# Altium PCB PCB2.PcbDoc (part 2 of 2)
Units mm, origin at the board's own origin, x right, y up, seen from the top; angles counter-clockwise.
Board outline 120.9 x 134.75 mm, 2 copper layers (Top Layer, Bottom Layer); 83 components, 152 nets, 445 pads, 108 vias.
Unrouted connection lines stored in the file: 2.
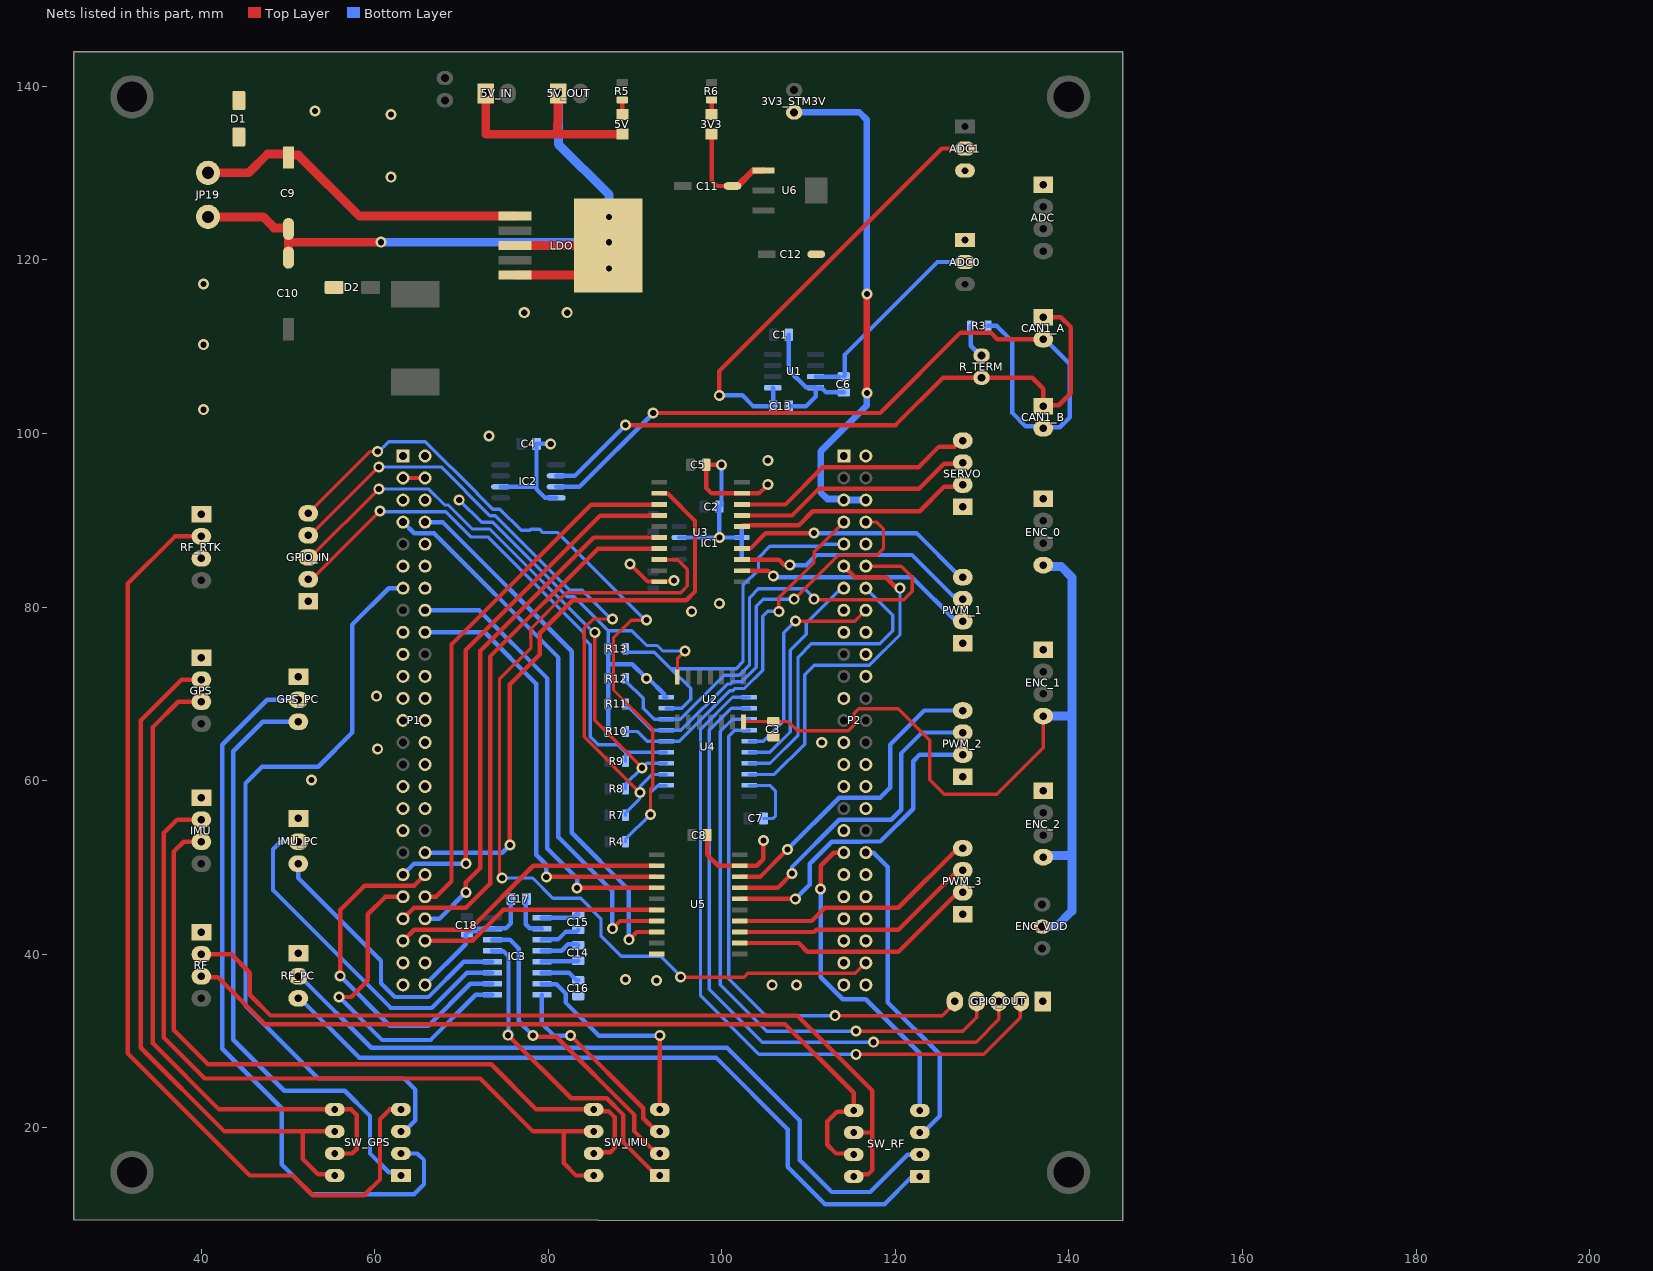
[diagram p2: the nets of this part, all layers, seen from the top]

## Via types
v1: diameter 1.27, hole 0.711, Top Layer to Bottom Layer, 108 vias

## Nets (pads, with @x,y where several pads share a name; then routed paths per layer and width w, separated by ;. In a path a pad name is that pad's centre, name@x,y a point inside that pad or via, vN(x,y) a via of type N, cw(c..) or ccw(c..) an arc to the next point about the centre after c; other vN are vias at no path point) (continued)
GND: 3V3.2 5V.2 5V_IN.1 5V_OUT.1 ADC0.1 ADC1.3 ADC.1 C1.1 C2.1 C3.1 C4.1 C5.1 C6.2 C7.1 C8.1 C9.2 C10.2 C11.2 C12.2 C13.2 C16.1 C17.1 C18.1 D1.A D2.A ENC_0.1 ENC_1.1 ENC_2.1 GPIO_IN.1 GPIO_OUT.1 GPS.1 GPS_PC.1 IC1.1 IC1.2 IC1.3 IC1.4 IC1.7 IC2.2 IC2.8 IC3.15 IMU.1 IMU_PC.1 JP19.1 LDO.3 LDO.5 LDO.6 P1.1 P1.2 P1.5 P1.23 P1.49 P1.50 P2.1 P2.2 P2.49 P2.50 PWM_1.1 PWM_2.1 PWM_3.1 R10.1 R11.1 R12.1 R13.1 RF.1 RF_PC.1 RF_RTK.1 SERVO.1 U1.4 U2.7 U3.10 U3.19 U4.10 U4.19 U5.10 U5.19 U6.1 | length 289.9
  Top Layer w0.381: U2.7@94.869,71.933 94.869,74.041 v1(95.758,74.93)
  Top Layer w0.508: v1(89.408,84.963) 91.427,82.944 92.748,82.944 U3.10@92.761,82.931 92.773,82.944 94.374,82.944 v1(94.488,83.058) ; C8.1@98.309,53.721 98.309,51.424 99.568,50.165 U5.19@102.057,50.165 104.007,50.165 104.775,50.933 v1(104.775,53.086) ; 3V3.2@98.806,134.493 98.806,129.159 99.441,128.524 C11.2@101.219,128.524 ; v1(99.949,96.393) C5.1@98.182,96.393 98.182,93.715 98.806,93.091 U3.19@102.311,93.091 104.267,93.091 v1(105.283,94.107)
  Top Layer w0.762: C11.2@101.219,128.524 101.79,128.524 103.552,130.285 104.744,130.285 U6.1@104.775,130.316
  Top Layer w1.016: JP19.1@40.767,124.968 47.117,124.968 48.387,123.698 49.657,123.698 C9.2@50.038,123.317 ; C10.2@50.038,120.269 50.038,122.047 ; C9.2@50.038,123.571 C9.2@50.038,123.317 ; v1(60.706,122.047) 50.038,122.047 ; 5V_IN.1@72.771,139.192 72.771,134.493 80.801,134.493 81.032,134.725 ; LDO.5@76.15,118.266 83.5,118.266 LDO.6@86.9,121.666 LDO.3@76.15,121.666 ; 5V_OUT.1@81.153,139.065 81.032,134.725 ; 5V.2@88.392,134.493 81.026,134.493 81.032,134.725 ; 50.038,122.047 C9.2@50.038,123.317
  Bottom Layer w0.381: v1(69.723,92.329) 72.299,89.753 73.579,89.753 82.153,81.179 82.961,81.179 86.884,77.255 ; R13.1@86.884,75.184 86.884,77.255 ; v1(95.758,74.93) 93.153,74.93 92.518,75.565 91.323,75.565 89.633,77.255 86.884,77.255 ; U4.19@103.149,59.436 105.537,59.436 106.172,58.801 106.172,55.88 105.918,55.626 C7.1@104.786,55.626
  Bottom Layer w0.508: P1.50@65.786,36.449 70.482,41.145 70.482,42.277 C18.1@70.612,42.407 70.858,42.653 71.609,42.653 71.882,42.926 IC3.15@73.54,42.926 73.868,42.926 73.914,42.972 75.103,42.972 75.681,43.55 C17.1@75.681,46.355 ; IC2.2@74.48,93.853 78.624,93.853 ; v1(80.264,98.806) C4.1@78.624,98.806 78.624,93.853 ; IC2.8@80.899,92.583 80.881,92.601 79.611,92.601 78.624,93.588 78.624,93.853 ; R10.1@86.884,65.659 R11.1@86.884,68.834 R12.1@86.884,71.755 86.884,73.406 ; R13.1@86.884,75.184 86.884,73.406 ; U4.10@93.599,69.596 93.345,69.596 93.345,69.94 91.53,71.755 v1(91.324,71.755) 89.673,73.406 86.884,73.406 ; IC1.7@95.079,88.011 95.084,88.016 v1@99.7,88.016 ; v1(99.949,96.393) 99.949,91.81 C2.1@99.706,91.567 v1(99.706,88.022) v1@99.7,88.016 ; IC1.4@102.279,85.471 IC1.3@102.279,86.741 IC1.2@102.279,88.011 ; IC1.1@102.279,89.281 IC1.2@102.279,88.011 ; C13.2@107.707,103.124 109.667,103.124 110.801,104.258 U1.4@110.801,105.283 ; C1.1@107.707,111.379 107.707,107.304 109.682,105.329 110.755,105.329 U1.4@110.801,105.283 ; C6.2@114.046,104.764 112.005,104.764 111.486,105.283 U1.4@110.801,105.283 ; v1@99.7,88.016 99.695,88.011 IC1.2@102.279,88.011
  Bottom Layer w1.016: v1(60.706,122.047) v1(86.995,122.047) 86.995,127.508 81.153,133.35 5V_OUT.1@81.153,139.192
  other v1: 105.791,36.449 108.585,36.449 92.456,36.957 88.9,37.084 52.705,60.071 60.325,63.627 111.506,64.389 60.198,69.723 96.52,79.502 99.695,80.391 105.283,96.901 73.152,99.695 40.259,102.743 40.259,110.236 77.216,113.919 82.169,113.919 40.259,117.221 86.995,118.999 86.995,124.968 61.849,129.54 61.849,136.779 53.086,137.16
GPS_RX: GPS.3 SW_GPS.5 SW_GPS.7 | length 76.8
  Top Layer w0.508: GPS.3@40.005,69.088 37.338,69.088 34.417,66.167 34.417,29.718 42.037,22.098 56.642,22.098 57.277,22.098 57.912,21.463 57.912,17.526 57.404,17.018 SW_GPS.7@55.372,17.018
GPS_RX_MCU: P1.13 SW_GPS.3 | length 89.7
  Bottom Layer w0.508: SW_GPS.3@62.992,19.558 63.373,19.558 64.643,20.828 64.643,24.384 63.373,25.654 53.467,25.654 45.085,34.036 45.085,59.69 46.99,61.595 53.467,61.595 57.404,65.532 57.404,77.978 61.595,82.169 P1.13@63.246,82.169
GPS_RX_PC: GPS_PC.3 SW_GPS.1 | length 70.3
  Bottom Layer w0.508: 43.688,31.369 43.688,30.125 49.556,24.257 56.515,24.257 59.436,21.336 59.436,17.018 61.613,14.841 SW_GPS.1@62.992,14.841 ; 43.688,31.395 43.688,63.373 47.079,66.764 GPS_PC.3@51.181,66.764
GPS_TX: GPS.2 SW_GPS.6 SW_GPS.8 | length 80.6
  Top Layer w0.508: GPS.2@40.005,71.628 37.719,71.628 33.02,66.929 33.02,29.21 42.672,19.558 51.689,19.558 ; SW_GPS.8@55.372,14.478 55.245,14.605 53.467,14.605 51.689,16.383 51.689,19.558 ; SW_GPS.6@55.372,19.558 51.689,19.558
GPS_TX_MCU: P1.14
GPS_TX_PC: GPS_PC.2 SW_GPS.2 | length 86.8
  Bottom Layer w0.508: GPS_PC.2@51.181,69.304 47.587,69.304 42.418,64.135 42.418,30.988 42.418,30.861 42.418,29.083 49.276,22.225 49.276,15.748 52.705,12.319 64.516,12.319 65.659,13.462 65.659,16.256 64.897,17.018 SW_GPS.2@62.992,17.018 SW_GPS.2@62.357,17.018
IMU_RX: IMU.3 SW_IMU.5 SW_IMU.7 | length 85.4
  Top Layer w0.508: IMU.3@40.005,52.959 37.973,52.959 36.83,51.816 36.83,31.242 40.767,27.305 73.406,27.305 78.613,22.098 SW_IMU.5@85.217,22.098 85.411,21.904 86.935,21.904 87.63,21.209 87.63,17.653 87.122,17.145 85.344,17.145 SW_IMU.7@85.217,17.018
IMU_RX_MCU: IC3.9 P1.41 | length 38.5
  Top Layer w0.508: v1(55.88,35.052) 57.277,35.052 59.182,36.957 59.182,44.577 61.214,46.609 P1.41@63.246,46.609
  Bottom Layer w0.508: v1(55.88,35.052) 60.833,30.099 66.421,30.099 71.628,35.306 IC3.9@73.54,35.306
IMU_RX_MCU_232: IC3.8 SW_IMU.3 | length 22.7
  Top Layer w0.508: v1(82.55,30.607) 90.932,22.225 90.932,21.082 92.456,19.558 SW_IMU.3@92.837,19.558
  Bottom Layer w0.508: IC3.8@79.248,35.306 79.248,32.004 80.645,30.607 v1(82.55,30.607)
IMU_RX_PC: IC3.12 IMU_PC.3 | length 32.9
  Bottom Layer w0.508: IMU_PC.3@51.181,50.419 51.181,48.768 60.706,39.243 60.706,36.632 62.286,35.052 66.168,35.052 70.232,39.116 IC3.12@73.54,39.116
IMU_RX_PC_232: IC3.13 SW_IMU.1 | length 37.3
  Top Layer w0.508: v1(75.357,30.653) 82.641,23.368 86.728,23.368 88.646,21.45 88.646,18.288 92.456,14.478 SW_IMU.1@92.837,14.478
  Bottom Layer w0.508: IC3.13@73.54,40.386 73.586,40.34 74.794,40.34 75.402,39.732 75.402,30.698 v1(75.357,30.653)
IMU_TX: IMU.2 SW_IMU.6 SW_IMU.8 | length 90.3
  Top Layer w0.508: IMU.2@40.005,55.499 37.211,55.499 35.687,53.975 35.687,30.353 40.386,25.654 72.136,25.654 78.232,19.558 81.788,19.558 ; SW_IMU.8@85.217,14.478 83.185,14.478 81.788,15.875 81.788,19.558 ; SW_IMU.6@85.217,19.558 81.788,19.558
IMU_TX_MCU: IC3.10 P1.40 | length 41
  Top Layer w0.508: v1(56.007,37.465) 56.007,45.085 58.801,47.879 64.516,47.879 P1.40@65.786,49.149
  Bottom Layer w0.508: v1(56.007,37.465) 61.722,31.75 66.167,31.75 70.993,36.576 IC3.10@73.54,36.576
IMU_TX_MCU_232: IC3.7 SW_IMU.4 | length 25.2
  Top Layer w0.508: SW_IMU.4@92.837,22.098 v1(92.837,30.607)
  Bottom Layer w0.508: IC3.7@79.248,36.576 79.294,36.53 80.945,36.53 81.977,35.498 81.977,34.426 85.796,30.607 v1(92.837,30.607)
IMU_TX_PC: IC3.11 IMU_PC.2 | length 40.6
  Bottom Layer w0.508: IMU_PC.2@51.181,52.959 49.149,52.959 48.26,52.07 48.26,47.371 61.849,33.782 66.548,33.782 70.612,37.846 IC3.11@73.54,37.846
IMU_TX_PC_232: IC3.14 SW_IMU.2 | length 35.5
  Top Layer w0.508: v1(78.232,30.607) 78.372,30.467 80.894,30.467 89.916,21.445 89.916,19.558 92.456,17.018 SW_IMU.2@92.837,17.018
  Bottom Layer w0.508: IC3.14@73.54,41.656 75.565,41.656 76.581,40.64 76.581,32.258 v1(78.232,30.607)
IN0: GPIO_IN.5 R4.1 U4.2 | length 87.3
  Top Layer w0.381: GPIO_IN.5@52.324,90.805 59.436,97.917 v1(60.325,97.917) ; v1(91.313,78.486) 89.535,78.486 87.503,76.454 87.503,70.435 92.011,65.926 92.011,59.272 91.757,59.018 v1(91.757,56.082)
  Bottom Layer w0.381: v1(60.325,97.917) 60.495,97.747 60.495,97.96 61.595,99.06 65.824,99.06 71.793,93.092 71.793,93.058 73.574,91.277 74.403,91.277 76.843,88.837 77.851,88.837 77.978,88.963 78.986,88.963 79.367,88.582 81.09,88.582 91.186,78.486 v1(91.313,78.486) ; R4.1@88.884,52.959 88.884,53.209 v1(91.757,56.082) 91.757,58.571 92.61,59.423 93.586,59.423 U4.2@93.599,59.436
IN1: GPIO_IN.4 R7.1 U4.3 | length 78.5
  Top Layer w0.381: GPIO_IN.4@52.324,88.265 52.546,88.265 60.42,96.139 v1(60.452,96.139) ; v1(87.376,78.613) 85.162,78.613 84.138,77.589 84.138,65.03 v1(90.551,58.616)
  Bottom Layer w0.381: v1(60.452,96.139) 67.634,96.139 73.258,90.515 73.895,90.515 82.469,81.941 83.479,81.941 83.921,81.941 87.249,78.613 v1(87.376,78.613) ; R7.1@88.884,56.007 88.884,56.257 90.551,57.924 v1(90.551,58.616) 90.551,59.309 91.935,60.693 93.586,60.693 U4.3@93.599,60.706
IN2: GPIO_IN.3 R8.1 U4.4 | length 67.2
  Top Layer w0.381: GPIO_IN.3@52.324,85.725 52.546,85.725 60.42,93.599 v1(60.452,93.599) ; v1(85.344,77.089) 85.344,66.929 v1(90.805,61.468)
  Bottom Layer w0.381: v1(60.452,93.599) 66.205,93.599 68.047,91.757 68.461,91.757 71.228,88.991 73.263,88.991 85.165,77.089 v1(85.344,77.089) ; R8.1@88.884,59.055 88.884,59.547 v1(90.805,61.468) 91.313,61.976 U4.4@93.599,61.976
IN3: GPIO_IN.2 R9.1 U4.5 | length 63.7
  Top Layer w0.381: GPIO_IN.2@52.324,83.185 52.705,83.185 v1(60.579,91.059)
  Bottom Layer w0.381: v1(60.579,91.059) 60.642,90.995 67.731,90.995 68.146,90.995 71.067,88.075 73.017,88.075 84.138,76.954 84.138,76.339 84.836,75.64 84.836,65.024 85.725,64.135 87.995,64.135 88.884,63.246 ; R9.1@88.884,62.23 88.884,63.246 ; U4.5@93.599,63.246 88.884,63.246
IN_0: P2.11 U4.18 | length 41.6
  Top Layer w0.508: P2.11@114.046,84.709 115.328,83.427 118.884,83.427 120.142,82.169 v1(120.523,82.169)
  Bottom Layer w0.381: U4.18@103.149,60.706 106.045,60.706 109.537,64.198 109.537,72.2 110.617,73.279 117.005,73.279 120.523,76.797 v1(120.523,82.169)
IN_1: P2.14 U4.17 | length 34.3
  Bottom Layer w0.381: U4.17@103.149,61.976 103.152,61.979 105.54,61.979 108.775,65.215 108.775,74.231 110.299,75.755 118.173,75.755 119.697,77.279 119.697,79.057 P2.14@116.586,82.169
IN_2: P2.13 U4.16 | length 25
  Bottom Layer w0.381: U4.16@103.149,63.246 105.537,63.246 107.886,65.596 107.886,74.993 109.728,76.835 109.728,78.119 113.778,82.169 P2.13@114.046,82.169
IN_3: P2.16 U4.15 | length 25.6
  Top Layer w0.381: v1(108.47,78.371) 115.328,78.371 P2.16@116.586,79.629
  Bottom Layer w0.381: U4.15@103.149,64.516 104.775,64.516 107.124,66.865 107.124,77.025 v1(108.47,78.371)
NC: P1.48
Net3V3_1: 3V3.1 R6.2 | length 1.7
  Top Layer w0.508: 3V3.1@98.806,136.779 R6.2@98.806,138.446
Net5V_1: 5V.1 R5.2 | length 1.7
  Top Layer w0.508: 5V.1@88.519,136.779 R5.2@88.519,138.446
NET_H: CAN1_A.2 CAN1_B.2 IC2.7 R3.1 | length 93.9
  Top Layer w0.508: v1(92.075,102.362) 118.237,102.362 127.508,111.633 130.97,111.633 131.732,110.871 CAN1_A.2@137.033,110.871
  Bottom Layer w0.508: IC2.7@80.899,93.853 83.584,93.853 92.075,102.344 v1(92.075,102.362) ; R3.1@130.667,112.395 131.687,112.395 133.477,110.605 133.477,102.362 135.001,100.838 136.779,100.838 CAN1_B.2@137.033,100.584 137.16,100.711 138.938,100.711 140.081,101.854 140.081,108.013 137.224,110.871 CAN1_A.2@137.033,110.871
NET_L: CAN1_A.1 CAN1_B.1 IC2.6 R_TERM.2 | length 78.4
  Top Layer w0.508: v1(88.9,100.965) 120.015,100.965 125.476,106.426 R_TERM.2@129.921,106.426 135.763,106.426 137.033,105.156 CAN1_B.1@137.033,103.124 137.16,103.251 138.811,103.251 140.208,104.648 140.208,112.268 139.065,113.411 CAN1_A.1@137.033,113.411
  Bottom Layer w0.508: IC2.6@80.899,95.123 83.058,95.123 v1(88.9,100.965)
NetADC0_2: ADC0.2 C6.1 U1.3 | length 23.6
  Bottom Layer w0.508: U1.3@110.801,106.553 C6.1@113.538,106.553 ; C6.1@114.046,106.564 114.173,106.691 114.173,109.093 124.841,119.761 ADC0.2@128.016,119.761
NetADC1_2: ADC1.2 C13.1 U1.5 | length 50.7
  Top Layer w0.508: v1(99.695,104.394) 99.695,107.196 125.341,132.842 ADC1.2@128.016,132.842
  Bottom Layer w0.508: v1(99.695,104.394) 102.362,104.394 103.632,103.124 C13.1@105.907,103.124 105.907,105.237 U1.5@105.861,105.283
NetC14_1: C14.1 IC3.5 | length 4.2
  Bottom Layer w0.508: IC3.5@79.248,39.116 79.294,39.162 83.369,39.162 C14.1@83.439,39.232
NetC14_2: C14.2 IC3.4 | length 4.6
  Bottom Layer w0.508: IC3.4@79.248,40.386 81.534,40.386 82.296,41.148 83.323,41.148 C14.2@83.439,41.032
NetC15_1: C15.1 IC3.3 | length 4.7
  Bottom Layer w0.508: IC3.3@79.248,41.656 79.28,41.688 81.11,41.688 81.977,42.555 83.206,42.555 C15.1@83.439,42.788
NetC15_2: C15.2 IC3.1 | length 4.4
  Bottom Layer w0.508: IC3.1@79.248,44.196 82.847,44.196 83.239,44.588 C15.2@83.439,44.588
NetC16_2: C16.2 IC3.6 | length 4.6
  Bottom Layer w0.508: IC3.6@79.248,37.846 82.361,37.846 83.239,36.968 C16.2@83.439,36.968
NetC17_2: C17.2 IC3.2 | length 5
  Bottom Layer w0.508: C17.2@77.481,46.355 77.386,46.26 77.386,43.432 77.846,42.972 79.202,42.972 IC3.2@79.248,42.926
NetR3_2: R3.2 R_TERM.1 | length 4
  Bottom Layer w0.508: R3.2@128.667,112.395 128.667,110.118 129.794,108.991 R_TERM.1@129.921,108.991
NRST: P1.6
OUT0: GPIO_OUT.5 U4.14 | length 59.2
  Top Layer w0.381: v1(113.03,32.893) 125.38,32.893 126.84,34.353 GPIO_OUT.5@126.84,34.544
  Bottom Layer w0.381: U4.14@103.149,65.786 101.473,65.786 100.774,65.087 100.774,37.148 105.029,32.893 v1(113.03,32.893)
OUT1: GPIO_OUT.4 U4.13 | length 67.4
  Top Layer w0.381: v1(115.443,31.115) 127.762,31.115 129.38,32.733 GPIO_OUT.4@129.38,34.544
  Bottom Layer w0.381: U4.13@103.149,67.056 101.219,67.056 99.822,65.659 99.822,36.449 105.156,31.115 v1(115.443,31.115)
OUT2: GPIO_OUT.3 U4.12 | length 74.5
  Top Layer w0.381: v1(117.475,29.845) 129.286,29.845 131.922,32.481 131.922,32.797 131.92,32.799 GPIO_OUT.3@131.92,34.544
  Bottom Layer w0.381: U4.12@103.149,68.326 101.092,68.326 98.552,65.786 98.552,35.941 104.648,29.845 v1(117.475,29.845)
OUT3: GPIO_OUT.2 U4.11 | length 81.2
  Top Layer w0.381: v1(115.443,28.448) 130.175,28.448 134.366,32.639 134.366,34.45 GPIO_OUT.2@134.46,34.544
  Bottom Layer w0.381: U4.11@103.149,69.596 101.219,69.596 97.536,65.913 97.536,35.179 104.267,28.448 v1(115.443,28.448)
OUT_0: P2.7 R10.2 U4.6 | length 41.4
  Top Layer w0.381: v1(106.553,79.502) 106.553,81.067 110.617,85.131 110.617,86.36 P2.7@114.046,89.789
  Bottom Layer w0.381: R10.2@88.884,65.659 90.228,65.659 91.371,64.516 U4.6@93.599,64.516 93.61,64.527 95.072,64.527 100.903,70.358 101.271,70.358 101.525,70.612 102.602,70.612 104.712,72.721 104.712,78.93 105.283,79.502 v1(106.553,79.502)
OUT_1: P2.8 R11.2 U4.7 | length 48.4
  Top Layer w0.381: v1(108.331,80.899) 113.399,85.967 117.844,85.967 118.618,86.741 118.618,89.027 117.856,89.789 P2.8@116.586,89.789
  Bottom Layer w0.381: R11.2@88.884,68.834 91.932,65.786 U4.7@93.599,65.786 95.254,65.786 100.588,71.12 100.955,71.12 101.209,71.374 102.287,71.374 103.95,73.037 103.95,80.073 104.775,80.899 v1(108.331,80.899)
OUT_2: P2.12 R12.2 U4.8 | length 55.1
  Top Layer w0.381: v1(110.617,80.899) 110.68,80.835 120.959,80.835 121.92,81.796 121.92,83.439 120.65,84.709 P2.12@116.586,84.709
  Bottom Layer w0.381: R12.2@88.884,71.755 88.884,71.505 90.932,69.457 90.932,68.326 92.202,67.056 U4.8@93.599,67.056 95.185,67.056 100.265,72.136 101.971,72.136 103.188,73.353 103.188,81.09 104.203,82.105 109.537,82.105 110.617,81.026 v1(110.617,80.899)
OUT_3: P2.9 R13.2 U4.9 | length 45.9
  Bottom Layer w0.381: R13.2@88.884,75.184 88.884,75.013 89.094,74.803 92.202,74.803 94.107,72.898 ; U4.9@93.599,68.326 95.377,68.326 96.393,69.342 96.393,70.612 94.107,72.898 ; P2.9@114.046,87.249 111.578,87.249 111.324,86.995 105.537,86.995 104.219,85.677 104.219,84.28 102.425,82.486 102.425,73.668 101.655,72.898 94.107,72.898
PA0: P1.12
PA1: P1.11
PA4: P1.16 U5.4 | length 52.1
  Top Layer w0.508: v1(83.312,47.625) U5.4@92.507,47.625
  Bottom Layer w0.508: P1.16@65.786,79.629 72.009,79.629 79.883,71.755 79.883,52.141 83.312,48.712 v1(83.312,47.625)
PA6: P1.18 U5.3 | length 50.8
  Top Layer w0.508: v1(79.756,48.895) U5.3@92.507,48.895
  Bottom Layer w0.508: P1.18@65.786,77.089 72.662,77.089 78.613,71.138 78.613,51.435 79.756,50.292 v1(79.756,48.895)
PA7: P1.17
PA8: P2.43
PA9: P2.44
PA10: P2.41
PA13: P2.42
PA14: P2.39
PA15: P2.40
PB0: P1.22
PB1: P1.21
PB2: P1.24
PB6: P2.23
PB9: P2.20
PB10: P1.34
PB11: P1.35
PB14: P1.38 U3.2 | length 69.4
  Top Layer w0.508: v1(75.565,52.578) 75.565,71.102 78.994,74.531 78.994,76.962 82.804,80.772 95.885,80.772 96.901,81.788 96.901,89.927 93.75,93.078 92.773,93.078 U3.2@92.761,93.091
  Bottom Layer w0.508: P1.38@65.786,51.689 74.676,51.689 v1(75.565,52.578)
PB15: P1.39 U3.4 | length 61.1
  Top Layer w0.508: v1(70.485,50.419) 70.485,75.057 85.966,90.538 92.748,90.538 U3.4@92.761,90.551
  Bottom Layer w0.508: P1.39@63.246,49.149 64.516,50.419 v1(70.485,50.419)
PC0: P1.8 U5.8 | length 62.6
  Top Layer w0.508: v1(89.281,41.656) 90.17,42.545 U5.8@92.507,42.545
  Bottom Layer w0.508: P1.8@65.786,89.789 67.8,89.789 82.677,74.912 82.677,53.975 89.281,47.371 v1(89.281,41.656)
PC1: P1.7 U5.7 | length 63.7
  Top Layer w0.508: v1(87.376,42.926) 88.265,43.815 U5.7@92.507,43.815
  Bottom Layer w0.508: P1.7@63.246,89.789 64.528,88.507 66.814,88.507 81.153,74.168 81.153,53.467 87.376,47.244 v1(87.376,42.926)
PC2: P1.10
PC5: P1.19
PC6: P2.47
PC7: P2.48 U3.8 | length 104.7
  Top Layer w0.381: v1(74.676,48.768) 74.358,49.085 74.358,71.691 77.995,75.328 77.966,77.466 82.049,81.661 95.25,81.661 96.012,82.423 96.012,84.328 94.882,85.458 92.773,85.458 U3.8@92.761,85.471 ; v1(95.25,37.338) 102.546,37.338 103.002,37.794 115.391,37.794 P2.48@116.586,38.989
  Bottom Layer w0.381: v1(74.676,48.768) 78.177,48.768 80.526,46.419 83.723,46.419 86.058,44.084 86.058,42.085 88.392,39.751 92.964,39.751 95.25,37.465 v1(95.25,37.338)
PC8: P2.45
PC9: P2.46
PC10: P2.37 SW_RF.4 | length 37.8
  Top Layer w0.508: v1(111.379,47.498) 111.379,50.165 112.903,51.689 P2.37@114.046,51.689
  Bottom Layer w0.508: v1(111.379,47.498) 111.379,37.337 113.918,34.798 116.586,34.798 122.809,28.575 SW_RF.4@122.809,21.971
PC11: P2.38 SW_RF.3 | length 37.5
  Bottom Layer w0.508: P2.38@116.586,51.689 117.475,51.689 119.126,50.038 119.126,34.417 125.095,28.448 125.095,21.336 123.19,19.431 SW_RF.3@122.809,19.431
PC12: P2.35
PC15: P2.10
PD2: P2.34
PD3: P2.31
PD4: P2.32
PD5: P2.29
PD6: P2.30
PD7: P2.27
PD10: P1.42 U3.3 | length 61.7
  Top Layer w0.508: P1.42@65.786,46.609 67.056,46.609 68.834,48.387 68.834,75.692 84.95,91.808 92.748,91.808 U3.3@92.761,91.821
PD11: P1.43 U3.7 | length 62.5
  Top Layer w0.508: P1.43@63.246,44.069 64.504,45.327 70.491,45.327 73.279,48.115 73.279,74.295 85.712,86.728 92.748,86.728 U3.7@92.761,86.741
PD12: P1.44 U3.6 | length 60.5
  Top Layer w0.508: v1(70.485,47.117) 70.485,48.26 72.136,49.911 72.136,74.93 85.217,88.011 U3.6@92.761,88.011
  Bottom Layer w0.508: P1.44@65.786,44.069 67.437,44.069 v1(70.485,47.117)
PD13: P1.45 U5.2 | length 32.8
  Top Layer w0.508: P1.45@63.246,41.529 64.528,42.811 70.896,42.811 78.25,50.165 U5.2@92.507,50.165
PD14: P1.46 U5.6 | length 28.2
  Top Layer w0.508: P1.46@65.786,41.529 71.247,41.529 74.803,45.085 U5.6@92.507,45.085
PD15: P1.47
PE0: P2.17
PE1: P2.18
PE2: P2.15
PE7: P1.25
PE8: P1.26
PE10: P1.28
PE12: P1.30
PE13: P1.31
PE14: P1.32
PE15: P1.33
PWM0: SERVO.4 U3.18 | length 28.2
  Top Layer w0.508: U3.18@102.311,91.821 107.315,91.821 111.621,96.127 122.67,96.127 125.031,98.489 126.809,98.489 SERVO.4@127.508,99.187
PWM0_DIR+: SERVO.2 U3.16 | length 27.2
  Top Layer w0.508: U3.16@102.311,89.281 102.438,89.408 108.839,89.408 110.478,91.047 122.797,91.047 125.603,93.853 127.254,93.853 SERVO.2@127.508,94.107
PWM0_DIR-: SERVO.3 U3.17 | length 27.7
  Top Layer w0.508: U3.17@102.311,90.551 108.077,90.551 111.137,93.611 122.694,93.611 125.603,96.52 127.381,96.52 SERVO.3@127.508,96.647
PWM1: PWM_1.4 U3.14 | length 28
  Top Layer w0.508: U3.14@102.311,86.741 103.287,86.741 105.065,88.519 v1(110.617,88.519)
  Bottom Layer w0.508: v1(110.617,88.519) 122.428,88.519 PWM_1.4@127.508,83.439
PWM1_DIR+: PWM_1.2 U3.12 | length 27.6
  Top Layer w0.508: U3.12@102.311,84.201 105.283,84.201 v1(105.918,83.566)
  Bottom Layer w0.508: v1(105.918,83.566) 106.045,83.439 121.92,83.439 127,78.359 PWM_1.2@127.508,78.359
PWM1_DIR-: PWM_1.3 U3.13 | length 28
  Top Layer w0.508: U3.13@102.311,85.471 106.553,85.471 107.188,84.836 v1(107.823,84.836)
  Bottom Layer w0.508: v1(107.823,84.836) 109.728,84.836 110.883,85.991 121.908,85.991 126.619,81.28 127.127,81.28 PWM_1.3@127.508,80.899
PWM2: PWM_2.4 U5.18 | length 36.3
  Top Layer w0.508: U5.18@102.057,48.895 104.394,48.895 v1(107.569,52.07)
  Bottom Layer w0.508: v1(107.569,52.07) 113.525,58.027 118.225,58.027 119.38,59.182 119.38,64.135 123.317,68.072 PWM_2.4@127.508,68.072
PWM2_DIR+: PWM_2.2 U5.16 | length 37
  Top Layer w0.508: U5.16@102.057,46.355 v1(108.458,46.355)
  Bottom Layer w0.508: v1(108.458,46.355) 110.109,48.006 110.109,50.419 112.649,52.959 116.101,52.959 116.089,52.971 118.26,52.971 122.047,56.758 122.047,62.23 122.809,62.992 PWM_2.2@127.508,62.992
PWM2_DIR-: PWM_2.3 U5.17 | length 37.2
  Top Layer w0.508: U5.17@102.057,47.625 106.426,47.625 v1(108.077,49.276)
  Bottom Layer w0.508: v1(108.077,49.276) 108.077,50.039 113.525,55.487 119.519,55.487 120.674,56.642 120.65,56.642 120.65,63.119 123.063,65.532 PWM_2.3@127.508,65.532
PWM3: PWM_3.4 U5.14 | length 29
  Top Layer w0.508: U5.14@102.057,43.815 110.363,43.815 111.875,45.327 120.321,45.327 127.317,52.324 PWM_3.4@127.508,52.324
PWM3_DIR+: PWM_3.2 U5.12 | length 28.8
  Top Layer w0.508: U5.12@102.057,41.275 108.839,41.275 109.843,40.271 120.344,40.271 127.317,47.244 PWM_3.2@127.508,47.244
PWM3_DIR-: PWM_3.3 U5.13 | length 28.4
  Top Layer w0.508: U5.13@102.057,42.545 110.629,42.545 110.871,42.787 120.321,42.787 127.317,49.784 PWM_3.3@127.508,49.784
RF_RTK_RX: RF_RTK.3
RF_RTK_TX: RF_RTK.2 SW_GPS.4 | length 111.3
  Top Layer w0.508: RF_RTK.2@40.005,88.138 36.957,88.138 31.496,82.677 31.496,28.575 45.593,14.478 50.546,14.478 52.832,12.192 58.757,12.192 60.587,14.022 60.587,20.963 61.722,22.098 SW_GPS.4@62.992,22.098
RF_RX: RF.3 SW_RF.5 SW_RF.7 | length 92.5
  Top Layer w0.508: RF.3@40.005,37.427 40.094,37.338 41.91,37.338 47.325,31.923 107.269,31.923 115.189,24.003 SW_RF.5@115.189,21.971 115.062,21.844 113.284,21.844 112.141,20.701 112.141,18.034 113.157,17.018 115.062,17.018 SW_RF.7@115.189,16.891
RF_RX_PC: RF_PC.3 SW_RF.1 | length 85.3
  Bottom Layer w0.508: RF_PC.3@51.181,34.887 51.371,34.887 58.191,28.067 99.314,28.067 107.569,19.812 107.569,15.494 111.887,11.176 118.745,11.176 121.92,14.351 SW_RF.1@122.809,14.351
RF_TX: RF.2 SW_RF.6 SW_RF.8 | length 99.1
  Top Layer w0.508: RF.2@40.005,39.967 43.472,39.967 45.593,37.846 45.593,35.306 47.981,32.918 108.687,32.918 117.348,24.257 117.348,19.431 ; SW_RF.8@115.189,14.351 115.845,14.351 116.099,14.605 116.84,14.605 117.348,15.113 117.348,19.431 ; SW_RF.6@115.189,19.431 117.348,19.431
RF_TX_PC: RF_PC.2 SW_RF.2 | length 86.4
  Bottom Layer w0.508: RF_PC.2@51.181,37.427 51.371,37.427 59.588,29.21 100.579,29.21 108.966,20.823 108.966,16.256 112.649,12.573 117.094,12.573 121.412,16.891 SW_RF.2@122.809,16.891
STM_3V_OUT: 3V3_STM3V.1 P2.5 P2.6 | length 59.5
  Top Layer w0.762: v1(116.713,104.648) v1(116.713,116.078)
  Bottom Layer w0.762: 3V3_STM3V.1@108.331,137.033 115.824,137.033 116.713,136.144 v1(116.713,116.078) ; P2.6@116.586,92.329 P2.5@114.046,92.329 113.931,92.444 112.153,92.444 111.379,93.218 111.379,97.917 116.713,103.251 v1(116.713,104.648)
VCC_ENC: C3.2 ENC_0.4 ENC_1.4 ENC_2.4 ENC_VDD.2 U2.14 | length 102.8
  Top Layer w0.381: U2.14@102.489,66.751 102.54,66.802 107.664,66.802 108.731,65.734 114.541,65.734 115.241,66.434 115.241,67.743 115.774,68.276 116.09,68.276 116.091,68.274 120.321,68.274 123.952,64.643 123.952,60.071 125.603,58.42 131.699,58.42 137.033,63.754 ENC_1.4@137.033,67.437
  Bottom Layer w1.016: ENC_VDD.2@136.906,43.18 138.557,43.18 140.335,44.958 140.335,51.435 ; ENC_2.4@137.033,51.181 137.203,51.351 140.251,51.351 140.335,51.435 ; ENC_1.4@137.033,67.437 140.208,67.437 140.335,67.31 ; ENC_0.4@137.033,84.836 137.203,84.666 139.108,84.666 140.335,83.439 140.335,67.31 ; 140.335,51.435 140.335,67.31
VDD_OUT: P1.3 P1.4 | length 2.5
  Top Layer w0.508: P1.3@63.246,94.869 P1.4@65.786,94.869
VDD_OUT1: P2.22
VIN: C9.1 D1.K JP19.2 LDO.1 | length 39.6
  Top Layer w1.016: JP19.2@40.767,130.048 45.466,130.048 47.625,132.207 49.911,132.207 50.038,132.08 C9.1@50.038,131.953 ; C9.1@50.038,131.826 C9.1@50.038,131.953 ; LDO.1@76.2,125.066 LDO.1@76.15,125.066 58.195,125.066 51.181,132.08 50.165,132.08 C9.1@50.038,131.953
pads on no net: C1.0 C2.0 C3.0 C4.0 C5.0 C6.0 C7.0 C8.0 C13.0 C14.0 C15.0 C16.0 C17.0 C18.0 D1.0 D2.0 IC2.5 R1.0 R2.0 R3.0 R4.0 R5.0 R6.0 R7.0 R8.0 R9.0 R10.0 R11.0 R12.0 R13.0 TP1.1 TP2.1 TP3.1 TP4.1 U3.5 U3.9 U3.11 U3.15 U5.5 U5.9 U5.11 U5.15
copper on no net: | length 0.2
  Top Layer w0.254: 203.2,50.926 203.327,51.053

## Polygon pours and split planes (outlines as drawn)
GND on Bottom Layer "Bottom Layer-GND" (solid, pour order 6): 25.273,144.018 146.177,144.018 146.177,9.398 25.273,9.398
GND on Top Layer "Top Layer-GND" (solid, pour order 4): 25.273,144.018 146.177,144.018 146.177,9.398 25.273,9.398

## Other copper
Bottom Layer:
  pour cut-out: 88.403,76.782
  pour cut-out: 88.265,76.962

## Silkscreen, mask and mechanical layers (free items; w line width, h text height)
Top Overlay:
  lines w0.254: 52.248,22.235 52.258,22.225 52.603,22.225 52.603,17.435 52.893,17.145 53.99,17.145 ; 52.299,14.539 52.309,14.529 53.34,14.529 53.34,19.314 53.634,19.609 53.965,19.609 53.975,19.619 ; 52.603,22.235 54,22.235 ; 53.34,14.539 53.975,14.539 ; 82.093,22.108 82.103,22.098 82.448,22.098 82.448,17.308 82.738,17.018 83.835,17.018 ; 82.144,14.412 82.154,14.402 83.185,14.402 83.185,19.187 83.479,19.482 83.81,19.482 83.82,19.492 ; 82.448,22.108 83.845,22.108 ; 83.185,14.412 83.82,14.412 ; 112.065,21.981 112.075,21.971 112.42,21.971 112.42,17.181 112.71,16.891 113.807,16.891 ; 112.116,14.285 112.126,14.275 113.157,14.275 113.157,19.06 113.451,19.355 113.782,19.355 113.792,19.365 ; 112.42,21.981 113.817,21.981 ; 113.157,14.285 113.792,14.285 ; 25.273,9.398 25.273,144.018 146.177,144.018 146.177,9.271 146.05,9.398 25.273,9.398 ; 57.023,32.131 62.484,32.131 123.444,32.131 123.444,133.223 57.023,133.223 57.023,32.131
  text "CH" at 141.224,112.776 h1.27
  text "CL" at 141.224,110.236 h1.27
  text "CH" at 141.224,102.616 h1.27
  text "CL" at 141.224,100.076 h1.27
  text "PWM" at 130.683,98.425 h1.27
  text "D-" at 131.064,96.012 h1.27
  text "D+" at 131.064,93.472 h1.27
  text "0" at 141.224,91.821 h1.27
  text "0" at 131.826,91.059 h1.27
  text "IN0" at 45.085,90.297 h1.27
  text "0" at 34.925,90.043 h1.27
  text "B" at 141.224,89.281 h1.27
  text "IN1" at 45.085,87.757 h1.27
  text "TX" at 33.655,87.503 h1.27
  text "A" at 141.224,86.741 h1.27
  text "IN2" at 45.085,85.344 h1.27
  text "RX" at 33.655,84.963 h1.27
  text "VCC" at 141.224,84.074 h1.27
  text "IN3" at 45.085,82.677 h1.27
  text "PWM" at 130.683,82.55 h1.27
  text "5V" at 33.655,82.296 h1.27
  text "D-" at 131.064,80.137 h1.27
  text "0" at 46.355,80.01 h1.27
  text "D+" at 131.064,77.597 h1.27
  text "0" at 131.826,75.184 h1.27
  text "0" at 141.351,74.422 h1.27
  text "0" at 34.925,73.533 h1.27
  text "B" at 141.351,71.882 h1.27
  text "0" at 46.101,71.247 h1.27
  text "TX" at 33.655,70.993 h1.27
  text "A" at 141.351,69.342 h1.27
  text "TX" at 45.72,68.707 h1.27
  text "RX" at 33.655,68.453 h1.27
  text "PWM" at 130.683,67.31 h1.27
  text "VCC" at 141.351,66.675 h1.27
  text "RX" at 45.72,66.167 h1.27
  text "5V" at 33.655,65.786 h1.27
  text "D-" at 130.683,64.897 h1.27
  text "D+" at 130.683,62.357 h1.27
  text "0" at 131.826,59.944 h1.27
  text "0" at 141.224,58.293 h1.27
  text "0" at 34.925,57.277 h1.27
  text "B" at 141.224,55.753 h1.27
  text "0" at 45.974,54.864 h1.27
  text "TX" at 33.655,54.737 h1.27
  text "A" at 141.224,53.213 h1.27
  text "TX" at 45.593,52.324 h1.27
  text "RX" at 33.655,52.197 h1.27
  text "PWM" at 130.556,51.435 h1.27
  text "VCC" at 141.224,50.546 h1.27
  text "RX" at 45.593,49.784 h1.27
  text "5V" at 33.655,49.53 h1.27
  text "D-" at 130.81,49.022 h1.27
  text "D+" at 130.81,46.482 h1.27
  text "5V" at 138.811,44.958 h1.52
  text "0" at 131.826,44.069 h1.27
  text "0" at 34.925,41.91 h1.27
  text "3V3" at 138.811,39.878 h1.52
  text "TX" at 33.655,39.37 h1.27
  text "0" at 45.974,39.37 h1.27
  text "RX" at 33.655,36.83 h1.27
  text "TX" at 45.593,36.83 h1.27
  text "RX" at 45.593,34.29 h1.27
  text "5V" at 33.655,34.163 h1.27
  text "IMU_TX_MCU" at 94.767,21.717 h1.02
  text "GPS_RX" at 46.203,21.666 h1.02
  text "GPS_TX_MCU" at 64.541,21.59 h1.02
  text "IMU_RX" at 76.2,21.59 h1.02
  text "RF_RX" at 106.807,21.463 h1.02
  text "RF_TX_MCU" at 124.485,21.463 h1.02
  text "IMU_RX_MCU" at 94.767,19.101 h1.02
  text "GPS_RX_MCU" at 64.541,18.974 h1.02
  text "RF_RX_MCU" at 124.485,18.847 h1.02
  text "IMU_TX_PC" at 94.767,16.561 h1.02
  text "GPS_TX_PC" at 64.541,16.434 h1.02
  text "RF_TX_PC" at 124.485,16.307 h1.02
  text "IMU_RX_PC" at 94.767,14.072 h1.02
  text "GPS_TX" at 46.304,14.021 h1.02
  text "GPS_RX_PC" at 64.541,13.945 h1.02
  text "IMU_TX" at 76.327,13.843 h1.02
  text "RF_RX_PC" at 124.485,13.818 h1.02
  text "RF_TX" at 106.934,13.716 h1.02

## Text inside footprints (layer, text, board x,y; h text height)
P1: Top Overlay "2" at 65.278,99.949 h1.27 r270; Top Overlay "1" at 62.738,99.949 h1.27 r270; Top Overlay "49" at 62.738,34.798 h1.27 r270; Top Overlay "50" at 65.278,34.798 h1.27 r270
P2: Top Overlay "2" at 116.078,99.949 h1.27 r270; Top Overlay "1" at 113.538,99.949 h1.27 r270; Top Overlay "49" at 113.538,34.671 h1.27 r270; Top Overlay "50" at 116.078,34.671 h1.27 r270
SW_GPS: Top Overlay "1" at 63.144,13.106 h1.27 r90
SW_IMU: Top Overlay "1" at 92.989,13.106 h1.27 r90
SW_RF: Top Overlay "1" at 122.961,12.979 h1.27 r90